# Altium PCB NMEA2K-Converter-v1.0.PcbDoc (part 4 of 4)
Units mil, origin at the board's own origin, x right, y up, seen from the top; angles counter-clockwise.
Board outline 1771.65 x 1968.5 mil, 4 copper layers (Top Layer, Layer 1, Layer 2, Bottom Layer), stack 62.45 mil thick; 138 components, 82 nets, 467 pads, 178 vias.
Unrouted connection lines stored in the file: 6.
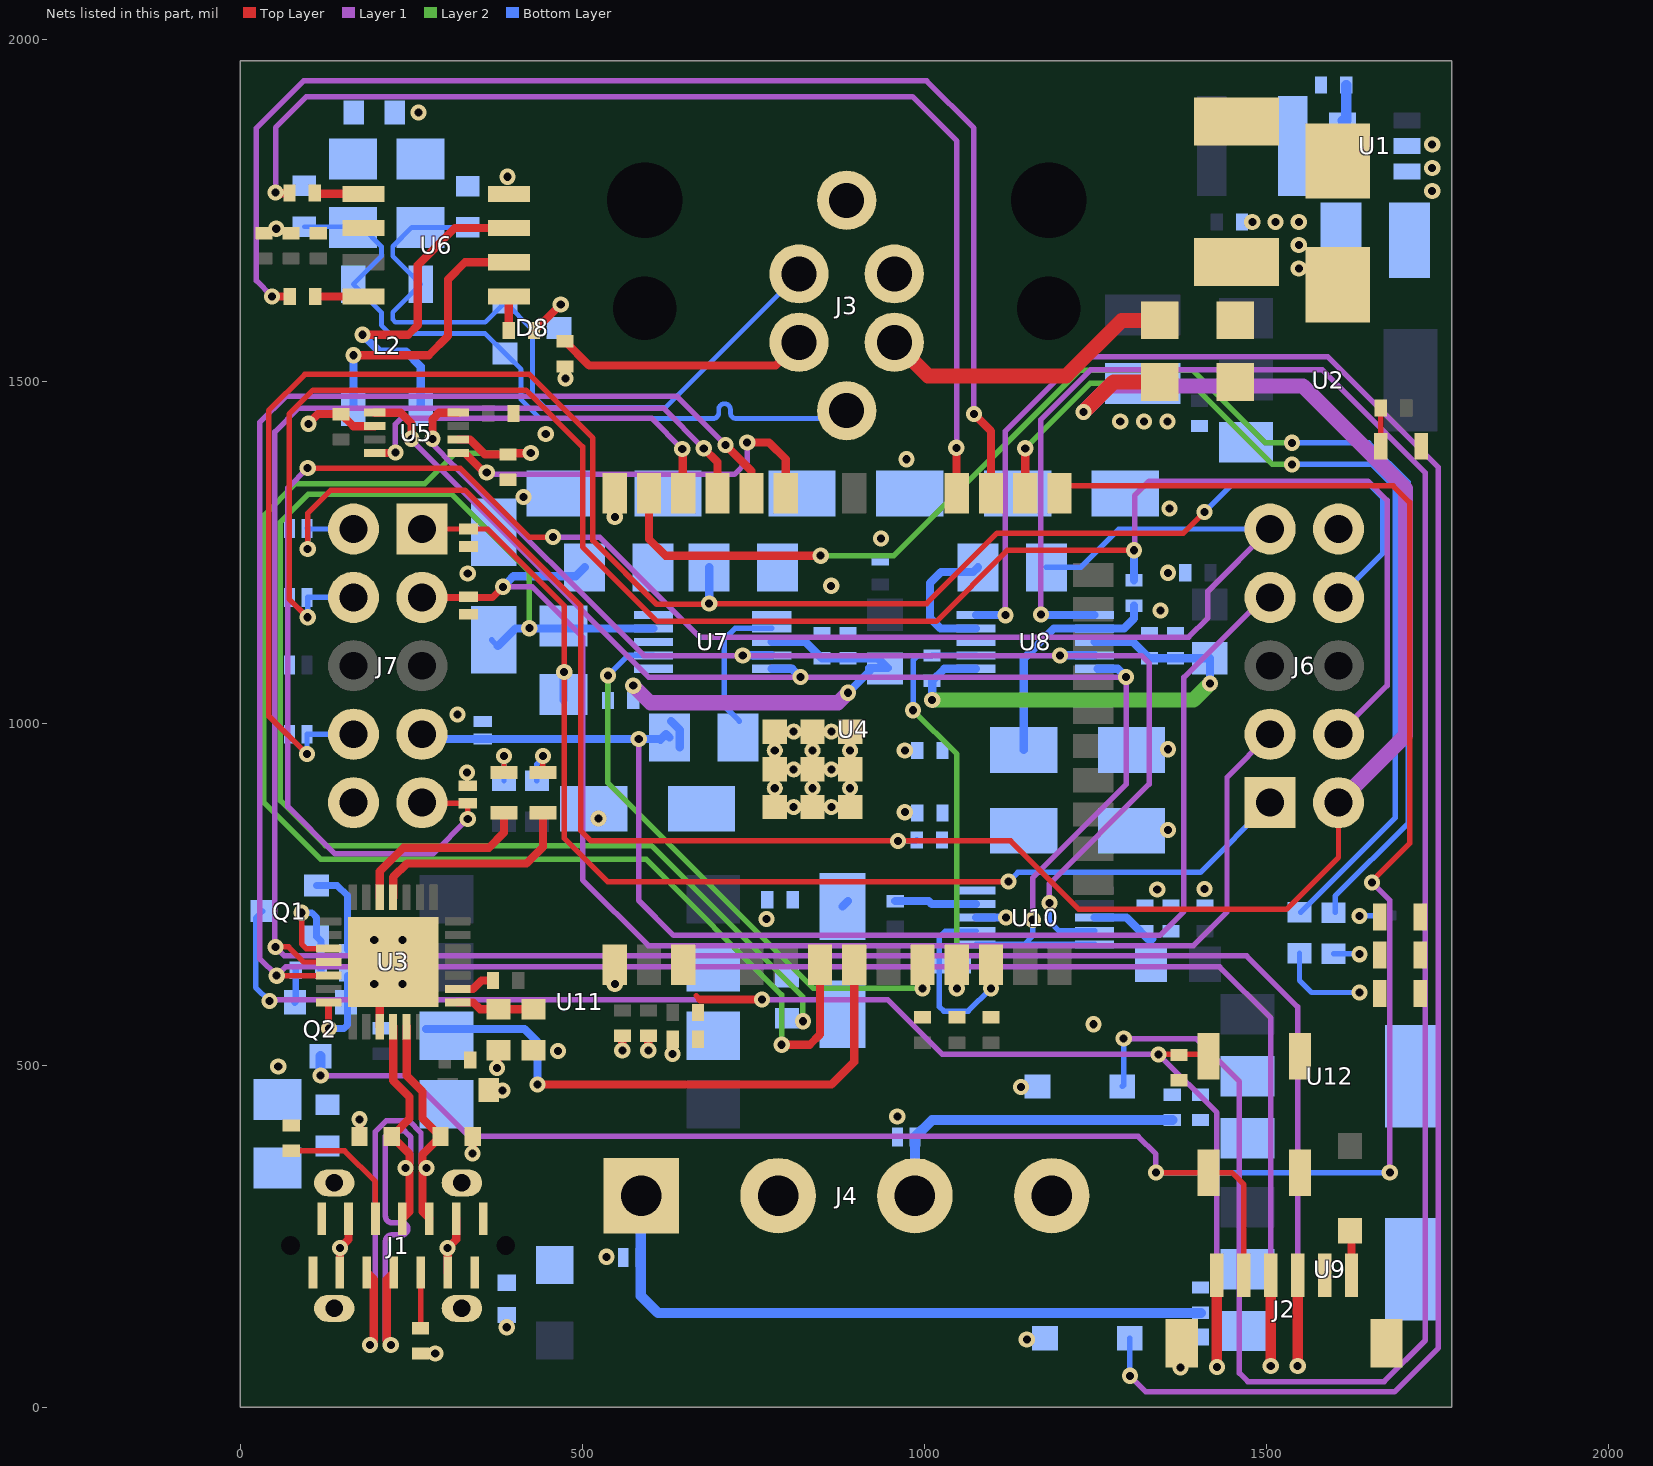
[diagram p4: the nets of this part, all layers, seen from the top]

## Via types
v1: diameter 23.62, hole 11.81, Top Layer to Bottom Layer, tented both sides, 178 vias

## Nets (pads, with @x,y where several pads share a name; then routed paths per layer and width w, separated by ;. In a path a pad name is that pad's centre, name@x,y a point inside that pad or via, vN(x,y) a via of type N, cw(c..) or ccw(c..) an arc to the next point about the centre after c; other vN are vias at no path point) (continued)
CAN_N: C21.1 D8.1 J3.5 L2.3 R23.1 | length 1070
  Bottom Layer w7: C21.1@93.87,1725.68 163.87,1725.68 R23.1@164.87,1724.68 178.62,1724.68 206.62,1696.68 206.62,1682.4 L2.3@165.66,1641.44 206.62,1600.48 206.62,1581.59 218.79,1569.43 358.35,1569.43 D8.1@387.5,1540.28 410.87,1516.91 410.87,1472.84 438.54,1445.18 687.87,1445.18 691.37,1445.18 ccw(c691.37,1453.68) 699.87,1453.68 699.87,1458.44 cw(c708.37,1458.44) 716.87,1458.44 716.87,1453.68 ccw(c725.37,1453.68) 725.37,1445.18 832.87,1445.18 875.37,1445.18 J3.5@886.87,1456.68
CAN_P: C19.2 D8.2 J3.4 L2.4 R19.2 | length 1070
  Bottom Layer w7: C19.2@332.87,1724.68 R19.2@263.87,1724.68 251.12,1724.68 223.12,1696.68 223.12,1682.4 L2.4@264.09,1641.44 223.12,1600.48 223.12,1590.03 227.22,1585.93 358.35,1585.93 D8.2@387.5,1615.08 427.37,1575.21 427.37,1479.68 445.37,1461.68 622.19,1461.68 J3.4@817.19,1656.68
CAN_VIN: D3.1 J3.2 | length 441.9
  Top Layer w22: J3.2@956.56,1556.68 1005.56,1507.68 1207.87,1507.68 1288.87,1588.68 D3.1@1344.64,1588.68
COOLANT: D22.1 R37.1 U7.7 | length 205.1
  Bottom Layer w8: R37.1@729.87,1002.68 707.87,1024.68 707.87,1122.68 723.59,1138.39 U7.7@777.35,1138.39
DI0: R30.2 U4.8 U11.6 | length 851.5
  Top Layer w12: v1(434.87,471.68) 864.87,471.68 897.87,504.68 U4.8@897.87,646.7
  Bottom Layer w12: U11.6@271.97,552.68 415.87,552.68 434.87,533.68 434.87,507.59 v1(434.87,471.68)
DTR: Q2.2 R7.1 U3.28 | length 139.7
  Top Layer w10: U3.28@129.39,591.62 129.39,554.17 v1(129.87,553.68)
  Bottom Layer w10: v1(129.87,553.68) 151.87,553.68 156.87,558.68 R7.1@156.87,631.18
EN: C14.2 C15.2 J2.6 Q1.3 R12.1 SW2.1 U4.3 | length 2276.9
  Top Layer w8: 666.87,601.68 672.83,595.72 ; v1(1342.87,515.68) 1412.94,515.68 SW2.1@1415.94,512.68
  Top Layer w12: 672.83,595.72 v1(762.84,595.72)
  Top Layer w15: v1@1428.02,58.79 J2.6@1428.02,192.68
  Layer 1 w8: v1(42.87,593.68) 44.92,595.72 v1(762.84,595.72) 946.83,595.72 1026.87,515.68 v1(1342.87,515.68) 1428.13,430.42 v1(1428.13,58.68)
  Bottom Layer w8: Q1.3@33.13,725.08 22.87,714.82 22.87,613.68 v1(42.87,593.68)
FUEL1: D27.2 R28.1 U8.5 | length 2886.5
  Layer 1 w8: v1(1118.87,1157.68) 1118.87,1426.68 1227.87,1535.68 1589.87,1535.68 1751.87,1373.68 1751.87,86.68 1687.47,22.27 1324.28,22.27 v1(1300.87,45.68)
  Bottom Layer w8: v1(1300.87,45.68) D27.2@1300.87,100.68
  Bottom Layer w12: U8.5@1076.12,1158.08 1118.47,1158.08 v1(1118.87,1157.68)
FUEL2: D28.2 R33.1 U8.6 | length 3280.6
  Layer 1 w8: v1(1170.87,1158.68) 1170.87,1443.68 1243.87,1516.68 1338.87,1516.68 1582,1516.68 1732.87,1365.81 1732.87,97.68 1672.47,37.27 1473.28,37.27 1460.87,49.68 1460.87,475.68 1397.87,538.68 v1(1291.87,538.68)
  Bottom Layer w8: D28.2@1289.87,468.68 1291.87,470.68 v1(1291.87,538.68)
  Bottom Layer w12: v1(1170.87,1158.68) 1171.42,1158.13 U8.6@1249.3,1158.13
FUEL_IN1: D17.2 J4.1 R27.1 R28.2 U9.1 | length 975.2
  Bottom Layer w15: J4.1@585.87,309.06 D17.2@585.87,218.68 585.87,162.68 610.87,137.68 R27.1@1404.37,137.68
FUEL_IN2: D18.2 J4.3 R32.1 R33.2 U12.1 | length 472.1
  Bottom Layer w15: J4.3@986.61,309.06 986.61,394.42 1011.87,419.68 R33.2@1362.87,419.68
GND: C2.1 C3.1 C4.1 C5.1 C6.1 C7.2 C8.1 C9.1 C10.1 C11.1 C12.1 C13.1 C14.1 C15.1 C16.1 C17.2 C18.1 C19.1 C20.2 C21.2 C22.2 C23.2 C24.2 C25.2 C26.2 C27.2 C28.2 C29.2 C30.2 D2.1 D5.1 D6.1 D7.1 D8.3 D9.1 D10.1 D11.1 D12.1 D13.1 D14.1 D15.1 D16.1 D17.1 D18.1 D19.2 D20.2 D21.2 D22.2 D23.2 D24.2 D25.2 D26.2 D27.1 D28.1 J1.A1 J1.A12 J1.B1 J1.B12 J2.2 J2.MP1 J2.MP2 J3.3 J3.SH J4.2 J4.4 J6.10 J7.10 LED1.2 LED4.2 LED5.2 LED6.2 R2.2 R3.2 R8.1 R10.1 R13.1 R21.1 R41.1 R42.1 R43.1 SB1.1 SW1.2 SW2.2 U1.4 U2.1 U3.3 U3.29 U4.1 U4.38 U4.39 U5.2 U6.2 U6.8 U7.1 U7.3 U8.3 U10.3 U11.3 U11.5 | length 496.5
  Top Layer w12: v1(99.94,1437.5) 114.12,1451.68 C11.1@147.87,1451.68 165.5,1434.05 U5.2@196.83,1434.05 ; D6.1@174.63,395.68 174.87,395.92 v1(174.87,420.68) v1@174.87,422.68 ; U3.3@204.19,556.19 204.19,630.99 U3.29@223.87,650.68 ; R3.2@263.87,78.18 v1(285.37,78.18) ; v1@340.12,370.68 D7.1@340.12,395.68 ; C8.1@363.87,461.68 382.87,461.68 v1(383.87,462.68) ; v1(375.87,495.68) 375.87,519.68 R8.1@377.87,521.68 ; R21.1@429.87,1573.68 430.87,1573.68 v1(468.87,1611.68) ; v1(558.87,521.18) C13.1@558.87,542.68 ; v1(596.87,521.18) C12.1@596.87,542.68 ; v1(632.37,516.18) C14.1@632.37,537.68
  Bottom Layer w12: U10.3@1076.12,715.68 v1(1119.87,715.68)
  other v1: 1374.87,57.68 1150.23,98.65 389.87,116.68 535.87,219.68 339.87,370.68 960.87,424.68 1141.87,467.68 55.87,497.68 1247.87,559.68 196.23,618.65 237.23,618.65 547.87,618.53 196.23,682.65 237.23,682.65 769.87,713.68 1340.87,756.68 1409.98,757.28 1356.87,843.68 524.23,860.65 971.87,869.68 331.87,927.68 971.87,959.68 1356.87,961.68 317.87,1012.68 1345.87,1164.68 864.23,1200.65 332.87,1218.68 1356.87,1219.68 936.87,1269.68 547.87,1301.19 1358.87,1313.68 414.23,1330.65 974.23,1385.65 446.96,1422.5 1286.87,1440.68 1321.37,1440.68 1355.87,1440.68 475.87,1503.68 1547.87,1664.68 1547.87,1698.68 52.87,1722.68 1479.87,1732.68 1513.87,1732.68 1547.87,1732.68 390.87,1798.68 260.87,1892.68
I2C_OE: R13.2 U4.7 U5.6 | length 2073.7
  Top Layer w12: U5.6@318.87,1414.36 336.19,1414.36 357.87,1392.68 R13.2@391.87,1392.68 R13.2@395.56,1392.68 ; R13.2@396.93,1392 396.93,1393.13 398.37,1394.58 v1(424.97,1394.58) ; v1(791.87,529.68) 832.87,529.68 847.87,544.68 U4.7@847.87,646.7
  Layer 2 w8: v1(424.97,1394.58) 314.78,1394.58 270.06,1349.87 81.06,1349.87 34.87,1303.68 34.87,883.81 118,800.68 593.87,800.68 791.87,602.68 v1(791.87,529.68)
IG_ON_PWR: D1.1 D16.2 J6.2 J7.2 R44.2 | length 3435.2
  Top Layer w8: v1(98.87,1254.68) 98.87,1306.68 132.87,1340.68 328.87,1340.68 497.87,1171.68 497.87,842.68 512.87,827.68 v1(961.87,827.68) 1126.42,827.68 1226.42,727.68 1529.87,727.68 1605.87,803.68 J6.2@1605.87,883.68
  Top Layer w22: v1(1233,1454.55) 1277.02,1498.56 1344.76,1498.56 D1.1@1344.64,1498.68
  Layer 1 w22: v1(1233,1454.55) 1271.13,1492.68 1554,1492.68 1703.87,1342.81 1703.87,981.68 J6.2@1605.87,883.68
  Bottom Layer w8: D16.2@97.87,1284.68 D16.2@98.87,1283.68 ; v1(98.87,1254.68) D16.2@98.87,1283.68 ; J7.2@165.87,1283.68 D16.2@98.87,1283.68 ; v1(961.87,827.68) 987.65,827.68 R44.2@989.17,829.2
IO0: J2.5 Q2.3 SW1.1 U4.25 | length 3478.5
  Top Layer w8: U4.25@1197.87,1335.68 1197.87,1342.68 1201.87,1346.68 1685.87,1346.68 1709.87,1322.68 1709.87,824.21 1654.87,769.21 v1(1654.87,766.68) ; v1(1338.87,342.68) SW1.1@1415.94,342.68 1449.87,342.68 1467.39,325.16 J2.5@1467.39,192.68
  Layer 1 w8: v1(117.87,484.68) 245.87,484.68 334.87,395.68 1312.87,395.68 1338.87,369.68 v1(1338.87,342.68) ; v1(1654.87,766.68) 1680.87,740.68 v1(1680.87,342.68)
  Bottom Layer w8: v1(1338.87,342.68) v1(1680.87,342.68)
  Bottom Layer w15: Q2.3@117.47,512.94 117.47,485.08 v1(117.87,484.68)
IO4: R15.1 U4.26 | length 1387
  Top Layer w12: U4.26@1147.87,1335.68 v1(1147.87,1401.68)
  Layer 2 w8: v1(1147.87,1401.68) 1242.87,1496.68 1390.66,1496.68 1509.26,1378.08 v1(1537.87,1378.08)
  Bottom Layer w8: v1(1537.87,1378.08) 1654.73,1378.08 1688.87,1343.94 1688.87,861.68 R15.1@1550.87,723.68
IO23: R14.1 U4.37 | length 2039.5
  Top Layer w12: U4.37@597.87,1335.68 597.87,1268.68 621.87,1244.68 v1(848.87,1244.68)
  Layer 2 w8: v1(848.87,1244.68) 955.87,1244.68 1226.87,1515.68 1392.87,1515.68 1498.87,1409.68 v1(1537.87,1409.68)
  Bottom Layer w8: v1(1537.87,1409.68) 1650,1409.68 1707.87,1351.81 1707.87,853.81 1600.87,746.81 R14.1@1600.87,723.68
IO25: R16.2 R25.1 U4.10 U7.2 | length 856.9
  Layer 2 w8: v1(537.87,1069.68) 537.87,912.68 605.87,844.68 838.34,612.22 v1(997.87,612.22)
  Bottom Layer w8: R25.1@537.87,1032.68 v1(537.87,1069.68) 567.22,1099.02 U7.2@604.12,1099.02
IO26: R17.2 R26.1 U4.11 U8.2 | length 605.3
  Layer 2 w8: v1(983.87,1018.69) 1047.87,954.69 1047.87,769.68 v1(1047.87,612.22)
  Bottom Layer w8: v1@983.87,1014.68 v1(983.87,1018.69) 983.87,1091.68 990.87,1098.68 R26.1@1011.87,1098.68 1012.22,1099.02 U8.2@1076.12,1099.02
IO27: R18.2 R31.1 U4.12 U10.2 | length 251.5
  Bottom Layer w8: U10.2@1076.12,695.99 1031.19,695.99 1022.37,687.18 R31.1@1022.37,646.68 1022.37,585.18 1028.87,578.68 1064.34,578.68 v1(1097.87,612.22)
NetC1_1: C1.1 L1.1 U1.5
NetC1_2: C1.2 U1.6 | length 57.3
  Bottom Layer w15: U1.6@1611.63,1881.08 1617.37,1881.08 C1.2@1617.37,1932.68
NetC9_2: C9.2 J1.S1 J1.S2 J1.S3 J1.S4 R10.2
NetC20_1: C20.1 R19.1 R23.2
NetC22_1: C22.1 C23.1 FB1.1 R25.2 U7.8 | length 591.9
  Layer 1 w22: v1(574.87,1054.62) 599.82,1029.68 874.25,1029.68 v1(888.87,1044.3)
  Bottom Layer w12: U7.8@777.35,1118.71 826.84,1118.71 C22.1@850.87,1094.68 C23.1@888.87,1094.68 932.87,1094.68 946.87,1080.68 919.87,1080.68 919.87,1075.3 v1(888.87,1044.3)
NetC25_1: C25.1 C26.1 FB2.1 R26.2 U8.1 U8.8 | length 729
  Layer 2 w22: v1(1011.87,1033.68) 1393.87,1033.68 v1(1417.87,1057.68)
  Bottom Layer w12: v1(1011.87,1033.68) R26.2@1011.87,1061.68 1029.54,1079.34 U8.1@1076.12,1079.34 ; U8.8@1249.35,1118.71 1305.72,1118.71 C25.1@1329.75,1094.68 C26.1@1367.87,1094.68 FB2.1@1417.87,1094.68 v1@1417.87,1059.68
NetC28_1: C28.1 C29.1 FB3.1 R31.2 U10.8 | length 97.4
  Bottom Layer w12: U10.8@1249.35,715.68 1295.87,715.68 1306.87,704.68 1326.87,684.68 1333.87,684.68
NetD1_2: D1.2 D3.2 F1.2
NetD29_1: D29.1 J2.1 | length 65.8
  Top Layer w12: D29.1@1622.87,257.68 1624.87,255.68 J2.1@1624.87,192.68
NetJ1_A5: J1.A5 R2.1 | length 195.9
  Top Layer w8: R2.1@74.87,374.68 152.87,374.68 197.99,329.56 J1.A5@197.99,275.42
NetJ1_B5: J1.B5 R3.1 | length 81.8
  Top Layer w7: R3.1@263.87,115.18 R3.1@264.13,115.18
  Top Layer w8: R3.1@264.13,115.18 J1.B5@264.13,196.68
NetJ3_1: J3.1 SB1.2 | length 371.1
  Top Layer w12: SB1.2@474.87,1558.18 510.37,1522.68 783.19,1522.68 J3.1@817.19,1556.68
NetL2_1: L2.1 U6.7 | length 494.4
  Top Layer w12: v1(178.87,1567.68) 245.87,1567.68 259.87,1581.68 259.87,1669.68 313.87,1723.68 U6.7@393.17,1723.68
  Bottom Layer w12: v1(178.87,1567.68) 203.56,1542.99 242.56,1542.99 264.09,1521.46 264.09,1487.51 L2.1@264.09,1461.91
NetL2_2: L2.2 U6.6 | length 408
  Top Layer w12: v1(165.87,1537.68) 275.87,1537.68 303.87,1565.68 303.87,1648.68 328.87,1673.68 U6.6@393.17,1673.68
  Bottom Layer w12: L2.2@165.66,1461.91 v1@165.66,1537.68
NetLED1_1: LED1.1 R1.2 | length 56.1
  Top Layer w8: LED1.1@1667.82,1404.68 R1.2@1667.82,1460.73
NetLED2_1: LED2.1 R6.1 | length 60.3
  Top Layer w8: LED2.1@385.87,927.73 v1(385.87,951.87)
  Bottom Layer w8: R6.1@385.87,915.68 v1(385.87,951.87)
NetLED2_2: LED2.2 U3.19 | length 271.9
  Top Layer w12: U3.19@204.19,745.17 204.19,782.83 239.04,817.68 363.87,817.68 385.87,839.68 LED2.2@385.87,868.68
NetLED3_1: LED3.1 R9.1 | length 64.1
  Top Layer w8: LED3.1@442.87,927.73 v1(442.87,951.87)
  Bottom Layer w8: R9.1@433.87,915.68 433.87,939.96 442.87,948.96 v1(442.87,951.87)
NetLED3_2: LED3.2 U3.18 | length 316.7
  Top Layer w12: U3.18@223.87,745.17 223.87,774.68 243.87,794.68 418.87,794.68 442.87,818.68 LED3.2@442.87,868.68
NetLED4_1: LED4.1 R14.2 | length 38.2
  Bottom Layer w8: R14.2@1598.87,662.68 1636.21,662.68 v1(1636.8,662.08)
NetLED5_1: LED5.1 R15.2 | length 135.2
  Bottom Layer w8: R15.2@1548.87,663.68 1548.87,623.68 1566.47,606.08 v1(1636.8,606.08)
NetLED6_1: LED6.1 R20.1 | length 27.3
  Bottom Layer w8: v1(1636.8,718.08) 1663.28,718.08 R20.1@1663.87,718.68
NetQ1_1: Q1.1 R7.2 | length 130.6
  Bottom Layer w10: Q1.1@111.87,762.48 142.07,762.48 156.87,747.68 R7.2@156.87,668.18
NetQ2_1: Q2.1 R11.2 | length 47.5
  Bottom Layer w10: Q2.1@80.07,591.68 81.37,592.98 R11.2@81.37,638.68
NetR4_2: R4.2 U3.9 | length 56.6
  Top Layer w12: U3.9@318.36,611.31 340.5,611.31 352.87,623.68 R4.2@369.87,623.68
NetR5_2: R5.2 R8.2 U3.8 | length 114.6
  Top Layer w12: U3.8@318.36,591.62 340.93,591.62 350.87,581.68 R8.2@377.87,581.68 R5.2@428.87,581.68
NetR21_2: R21.2 U6.5 | length 50.1
  Top Layer w12: R21.2@392.87,1573.68 392.87,1623.38 U6.5@393.17,1623.68
NetR22_2: R22.2 U6.4 | length 70.7
  Top Layer w12: R22.2@109.87,1623.68 U6.4@180.57,1623.68
NetR24_2: R24.2 U6.1 | length 70.7
  Top Layer w12: R24.2@109.87,1773.68 U6.1@180.57,1773.68
NetR27_2: R27.2 U9.2 U9.4
NetR29_1: R29.1 U11.2
NetR32_2: R32.2 U12.2 U12.4
OIL_PRESS: D21.1 R36.1 U7.6
OIL_PRESS_IN: D11.2 J6.8 J7.8 R36.2 | length 2806.1
  Top Layer w8: v1(97.87,954.68) 41.87,1010.68 41.87,1456.68 94.87,1509.68 422.87,1509.68 515.87,1416.68 515.87,1266.68 608.87,1173.68 v1@684.87,1173.68 ; v1(685.87,1174.68) 1003.87,1174.68 1106.87,1277.68 1379.13,1277.68 v1(1409.94,1308.49)
  Bottom Layer w8: v1(97.87,954.68) D11.2@97.87,983.68 J7.8@165.87,983.68 ; v1(1409.94,1308.49) 1452.13,1350.68 1648.87,1350.68 1670.87,1328.68 1670.87,1248.68 J6.8@1605.87,1183.68
  Bottom Layer w12: v1(685.87,1174.68) R36.2@685.87,1227.68
OIL_TEMP-TRIM: D10.2 J6.3 J7.3 R35.2 | length 2036.4
  Top Layer w10: J7.3@265.87,1183.68 368.87,1183.68 v1(384.37,1199.18)
  Layer 1 w8: v1(384.37,1199.18) 427.37,1199.18 500.87,1125.68 500.87,770.68 596.87,674.68 1393.87,674.68 1442.87,723.68 1442.87,920.68 J6.3@1505.87,983.68
  Bottom Layer w12: v1@391.37,1206.18 399.87,1214.68 490.87,1214.68 R35.2@503.87,1227.68
RTS: Q1.2 R11.1 U3.24 | length 192.5
  Top Layer w8: v1(89.87,722.68) 89.87,676.99 96.5,670.36 U3.24@129.39,670.36
  Bottom Layer w10: v1(89.87,722.68) 104.87,722.68 111.87,715.68 Q1.2@111.87,687.68 118.37,681.18 R11.1@118.37,638.68
RXD0: J2.4 U3.26 U4.34 | length 3838.6
  Top Layer w8: v1(53.56,630.67) 53.68,630.67 129.06,630.67 U3.26@129.39,630.99
  Top Layer w12: v1(709.87,1406.68) 747.87,1368.68 U4.34@747.87,1335.68
  Top Layer w15: J2.4@1506.76,192.68 1506.82,192.62 1506.82,60.14 v1(1506.87,60.08)
  Layer 1 w8: v1(709.87,1406.68) 638.87,1477.68 66.87,1477.68 29.06,1439.87 29.06,655.28 53.68,630.67 66.43,643.42 1432.13,643.42 1506.87,568.68 v1(1506.87,60.08)
RXD1: R22.1 U4.27 | length 1932
  Top Layer w12: v1(46.87,1623.68) R22.1@72.87,1623.68 ; v1(1072.87,1451.68) 1097.87,1426.68 U4.27@1097.87,1335.68
  Layer 1 w8: v1(46.87,1623.68) 23.87,1646.68 23.87,1869.68 92.87,1938.68 1003.87,1938.68 1072.87,1869.68 v1(1072.87,1451.68)
SCL: U5.1 U7.10 U8.10 U10.1 U10.10 | length 1993.4
  Top Layer w12: U5.1@196.83,1453.73 234.82,1453.73 250.57,1437.98 v1(250.57,1415.54)
  Layer 1 w8: v1(250.57,1415.54) 250.57,1413.9 597.37,1067.11 858.31,1067.11 1291.21,1067.11 v1(1295.44,1067.11) 1295.44,910.24 1158.87,773.68 v1(1158.87,712.49)
  Bottom Layer w8: U10.1@1076.12,676.31 1076.21,676.4 1146.6,676.4 ; v1(1158.87,712.49) 1158.87,688.68 1146.6,676.4 ; U10.10@1249.87,676.21 1249.68,676.4 1146.6,676.4
  Bottom Layer w12: U7.10@777.35,1079.34 807.21,1079.34 v1(819.44,1067.11) ; U8.10@1253.35,1079.34 1283.21,1079.34 v1(1295.44,1067.11)
SCL_LV: U4.36 U5.4 | length 579.7
  Top Layer w12: U5.4@196.83,1394.68 196.92,1394.77 226.71,1394.77 v1(227.43,1395.49) ; v1(646.43,1400.86) 647.15,1400.14 647.15,1336.4 U4.36@647.87,1335.68
  Layer 1 w8: v1(227.43,1395.49) 226.84,1396.08 226.84,1436.64 235.51,1445.31 601.98,1445.31 v1(646.43,1400.86)
SDA: U5.8 U7.9 U8.9 U10.9 | length 1861.4
  Top Layer w12: v1(281.19,1415.54) 281.19,1444 290.93,1453.73 U5.8@318.87,1453.73
  Layer 1 w8: v1(281.19,1415.54) 281.19,1407.7 313.75,1375.15 590.22,1098.68 v1(734.87,1098.68) v1(1198.75,1098.68) 1317.87,1098.68 1328.87,1087.68 1328.87,910.68 1183.16,764.96 v1(1183.16,736.68)
  Bottom Layer w8: v1(1183.16,736.68) 1183.16,710.39 1197.46,696.09 1249.25,696.09 U10.9@1249.35,695.99
  Bottom Layer w12: v1(734.87,1098.68) 735.22,1099.02 U7.9@777.35,1099.02 ; v1@1198.8,1099.56 1198.8,1099.45 1199.17,1099.07 U8.9@1249.3,1099.07
SDA_LV: U4.33 U5.5 | length 587.7
  Top Layer w12: U5.5@318.87,1394.68 328.53,1394.68 354.79,1368.41 358.4,1368.41 v1(360.62,1366.19) ; v1(741.42,1410.22) 773.33,1410.22 797.87,1385.68 U4.33@797.87,1335.68
  Layer 1 w8: v1(360.62,1366.19) 363.13,1363.68 722.87,1363.68 741.42,1382.22 v1(741.42,1410.22)
STARTER: D24.1 R39.1 R41.2 U8.7 | length 338
  Bottom Layer w12: D24.1@1145.87,960.68 1145.87,1094.68 1189.59,1138.39 U8.7@1249.35,1138.39 1292.59,1138.39 1306.87,1152.68 R39.1@1306.87,1171.68
STARTER_IN: D14.2 J6.4 J7.4 R39.2 | length 2808.4
  Top Layer w8: v1(98.87,1154.68) 71.87,1181.68 71.87,1451.68 106.87,1486.68 417.87,1486.68 500.87,1403.68 500.87,1257.68 609.87,1148.68 1017.87,1148.68 1121.87,1252.68 v1(1306.87,1252.68) v1@1307.87,1252.68
  Layer 1 w8: v1@1307.87,1252.68 1307.87,1332.68 1328.87,1353.68 1648.87,1353.68 1676.87,1325.68 1676.87,1054.68 J6.4@1605.87,983.68
  Bottom Layer w8: v1(98.87,1154.68) 98.87,1183.68 J7.4@165.87,1183.68
  Bottom Layer w12: R39.2@1306.87,1208.68 1306.87,1251.68 v1@1307.87,1252.68
SWITCH: D26.1 R43.2 R44.1 U10.5
TACH: D19.1 R29.2 R34.1 U7.4 | length 2080.3
  Layer 2 w8: v1(422.87,1138.68) 422.87,1220.81 309,1334.68 99.87,1334.68 58.87,1293.68 58.87,886.68 124.87,820.68 601.87,820.68 822.83,599.72 v1(822.83,564.06)
  Bottom Layer w8: D19.1@367.87,1121.68 D19.1@375.87,1113.68
  Bottom Layer w12: D19.1@376.87,1112.68 402.59,1138.39 R34.1@472.87,1138.39 ; R34.1@477.59,1138.39 U7.4@604.12,1138.39
TACH_IN: D9.2 J6.1 J7.1 R34.2 | length 1746.2
  Top Layer w8: J7.1@265.87,1283.68 D9.2@333.87,1283.68 361.87,1283.68 473.87,1171.68 v1(473.87,1074.68) 473.87,831.68 537.43,768.13 v1(1123.68,768.13) v1@1120.7,765.14
  Bottom Layer w8: v1(1123.68,768.13) 1137.24,781.68 1403.87,781.68 J6.1@1505.87,883.68
  Bottom Layer w12: R34.2@472.87,1033.68 472.87,1073.68 v1(473.87,1074.68)
TILT_TRIM: D20.1 R35.1 U7.5
TXD0: J2.3 U3.25 U4.35 | length 3767.8
  Top Layer w8: v1(51.87,672.68) 70.87,672.68 92.87,650.68 U3.25@129.39,650.68
  Top Layer w12: v1(677.87,1401.68) 697.87,1381.68 U4.35@697.87,1335.68
  Top Layer w15: J2.3@1546.13,192.68 1546.19,192.62 1546.19,60.14 v1(1546.24,60.08)
  Layer 1 w8: v1@50.87,672.68 50.87,1425.68 85.51,1460.31 619.24,1460.31 v1(677.87,1401.68) ; v1(51.87,672.68) 64.87,659.68 1471.55,659.68 1546.24,584.98 v1(1546.24,60.08)
TXD1: R24.1 U4.28 | length 1673.1
  Top Layer w12: v1(51.87,1775.68) 52.87,1774.68 R24.1@72.37,1774.68 ; v1(1047.14,1402.41) 1047.51,1402.05 1047.51,1336.05 U4.28@1047.87,1335.68
  Layer 1 w8: v1(51.87,1775.68) 51.87,1870.68 96.87,1915.68 982.87,1915.68 1047.87,1850.68 1047.87,1403.15 v1(1047.14,1402.41)
USB_D_N: D7.2 J1.A7 J1.B7 U3.5 | length 881.9
  Top Layer w12: J1.B7@185.39,196.68 195.58,186.49 195.58,96.49 v1(189.77,90.68) ; U3.5@243.56,556.19 243.56,484.68 266.87,461.36 266.87,421.68 D7.2@292.87,395.68 266.55,369.35 v1@266.55,349.68 ; v1(272.36,349.68) 266.55,343.87 266.55,285.6 J1.A7@276.73,275.42
  Layer 1 w8: v1(189.77,90.68) 197.58,98.49 197.58,402.38 213.87,418.68 246.87,418.68 264.55,401 264.55,357.49 v1(272.36,349.68)
USB_D_P: D6.2 J1.A6 J1.B6 U3.4 | length 881.9
  Top Layer w12: v1(220.39,90.68) 214.58,96.49 214.58,186.49 J1.B6@224.76,196.68 ; U3.4@223.87,556.19 223.87,477.49 247.87,453.49 247.87,421.68 D6.2@221.87,395.68 247.55,370 v1@247.55,349.68 ; J1.A6@237.36,275.42 247.55,285.6 247.55,343.87 v1(241.74,349.68)
  Layer 1 w8: v1(220.39,90.68) 212.58,98.49 212.58,220.68 212.58,242.68 cw(c221.58,242.68) 221.58,251.68 236.15,251.68 ccw(c236.15,260.68) 236.15,269.68 221.58,269.68 cw(c221.58,278.68) 212.58,278.68 212.58,315.24 212.58,396.17 220.09,403.68 240.66,403.68 249.55,394.79 249.55,357.49 v1(241.74,349.68)
VBUS: D4.1 D5.2 J1.A4 J1.A9 J1.B4 J1.B9 R5.1 | length 167.9
  Top Layer w12: J1.B9@146.02,196.68 v1(146.02,232.53) 158.62,245.13 J1.A4@158.62,275.42 ; J1.B4@303.5,196.68 v1(303.5,232.53) 316.1,245.13 J1.A9@316.1,275.42
  other v1: 464.87,520.68
VIN: C2.2 D2.2 F1.1 U1.2 U1.3
  other v1: 1742.87,1777.68 1742.87,1811.68 1742.87,1845.68
VOLT_SIG: D25.1 R40.1 R42.2 U10.4 | length 131.3
  Bottom Layer w12: D25.1@880.87,731.68 D25.1@888.87,739.68 ; R40.1@957.87,739.68 964.2,739.68 1006.87,739.68 1011.19,735.36 U10.4@1076.12,735.36
WARNING: D23.1 R38.1 U8.4 | length 204.1
  Bottom Layer w12: U8.4@1076.12,1138.39 1024.16,1138.39 1008.87,1153.68 1008.87,1204.68 1024.87,1220.68 1071.87,1220.68 R38.1@1078.87,1227.68
WARNING_IN: D13.2 J6.9 J7.9 R38.2 | length 2857.5
  Top Layer w8: v1(98.87,1372.68) 321.87,1372.68 422.71,1271.84 v1(457.45,1271.84) ; J7.9@265.87,882.68 D13.2@332.87,882.68 v1(332.87,859.68)
  Layer 1 w8: v1(98.87,1372.68) 69.87,1343.68 69.87,877.68 138.87,808.68 281.87,808.68 v1(332.87,859.68) ; v1(457.45,1271.84) 525.71,1271.84 671.87,1125.68 1386.87,1125.68 1414.87,1153.68 1414.87,1192.68 J6.9@1505.87,1283.68
  Bottom Layer w8: R38.2@1178.87,1227.68 1228.87,1227.68 1284.87,1283.68 J6.9@1505.87,1283.68
WATER_TEMP: D12.2 J6.7 J7.7 R37.2 | length 1999.2
  Layer 1 w8: v1(582.87,976.68) 582.87,740.68 633.87,689.68 1344.87,689.68 1379.87,724.68 1379.87,1066.68 1496.87,1183.68 J6.7@1505.87,1183.68
  Bottom Layer w12: J7.7@265.87,983.68 272.87,976.68 613.87,976.68 614.87,975.68 622.87,983.68 R37.2@627.87,978.68 ; R37.2@629.87,1002.68 642.87,989.68 R37.2@642.87,964.68
pads on no net: J1. J3.MH U3.1 U3.2 U3.10 U3.11 U3.12 U3.13 U3.14 U3.15 U3.16 U3.17 U3.20 U3.21 U3.22 U3.23 U3.27 U4.4 U4.5 U4.6 U4.9 U4.13 U4.14 U4.15 U4.16 U4.17 U4.18 U4.19 U4.20 U4.21 U4.22 U4.23 U4.24 U4.29 U4.30 U4.32 U10.6 U10.7 U11.1 U11.4

## Polygon pours and split planes (outlines as drawn)
GND on Top Layer "GND_L01_P000" (solid, remove dead copper, pour order 0): 0,0 0,1968.5 1771.65,1968.5 1771.65,0
3V3 on Top Layer "3V3_L01_P011" (solid, remove dead copper, pour order 11): 286.87,433.68 302.87,417.68 369.87,417.68 369.87,435.68 325.87,435.68 318.87,442.68 318.87,577.68 257.87,577.68 257.87,523.68 286.87,494.68
VIN on Top Layer "VIN_L01_P008" (solid, pour order 8): 1341.87,1967.68 1772.87,1967.68 1772.87,1752.68 1341.87,1752.68
3V3 on Bottom Layer "3V3_L04_P009" (solid, remove dead copper, pour order 9): 1772.87,1422.68 1682.87,1422.68 1642.87,1462.68 1382.87,1462.68 1382.87,1536.68 1537.87,1536.68 1537.87,1634.68 1772.87,1634.68
GND on Bottom Layer "GND_L04_P001" (solid, remove dead copper, pour order 1): 0,0 0,1968.5 1771.65,1968.5 1771.65,0
VBUS on Bottom Layer "VBUS_L04_P010" (solid, remove dead copper, pour order 10): 497.87,267.68 497.87,540.68 438.87,540.68 438.87,267.68 58.87,267.68 58.87,169.68 497.87,169.68
NetC9_2 on Bottom Layer "NETC9_2_L04_P013" (solid, remove dead copper, pour order 13): 152.87,350.68 152.87,398.68 -4.13,398.68 -4.13,118.68 356.87,118.68 356.87,169.68 52.87,169.68 52.87,269.68 357.87,269.68 357.87,350.68 355.87,350.68
5V on Bottom Layer "5V_L04_P007" (solid, remove dead copper, pour order 7): 1441.87,1971.68 1441.87,1663.68 1525.87,1663.68 1525.87,1556.68 1258.87,1556.68 1258.87,1971.68
NetC1_1 on Bottom Layer "NETC1_1_L04_P006" (solid, remove dead copper, pour order 6): 1596.87,1971.68 1596.87,1914.68 1580.87,1914.68 1580.87,1857.68 1631.87,1857.68 1631.87,1829.68 1580.87,1829.68 1580.87,1770.68 1497.87,1770.68 1497.87,1971.68
VIN on Bottom Layer "VIN_L04_P005" (solid, remove dead copper, pour order 5): 1772.87,1857.68 1667.87,1857.68 1667.87,1644.68 1772.87,1644.68
3V3 on Layer 2 "3V3_L03_P002" (solid, remove dead copper, pour order 2): 1254.87,381.68 1254.87,603.68 1466.87,603.68 1466.87,381.68 1771.65,381.68 1771.65,1731.68 1396.87,1731.68 1396.87,1141.6 1666.87,1141.6 1666.87,1020.68 1466.87,1020.68 1466.87,674.68 157.87,674.68 157.87,381.68
5V on Layer 2 "5V_L03_P014" (solid, remove dead copper, pour order 14): 0,0 0,1968.5 1771.65,1968.5 1771.65,0
12V_BATT on Layer 2 "12V_BATT_L03_P012" (solid, remove dead copper, pour order 12): 109.87,1134.68 109.87,820.68 701.87,820.68 701.87,687.68 1453.87,687.68 1453.87,1028.68 1658.87,1028.68 1658.87,1134.68
GND on Layer 1 "GND_L02_P003" (solid, remove dead copper, pour order 3): 0,0 0,1968.5 1771.65,1968.5 1771.65,0

## Other copper
Top Layer:
  rectangle net 3V3: 957.87,517.68 1112.87,545.68
  rectangle net NetLED5_1: 1628.87,597.68 1674.87,613.68
  rectangle net NetLED4_1: 1628.87,653.68 1674.87,669.68
  rectangle net NetLED6_1: 1628.87,709.68 1674.87,725.68
  rectangle net GND: 17.87,1708.68 211.87,1735.68
  rectangle net 3V3: 17.87,1661.68 211.87,1688.68
  rectangle net VBUS: 420.87,509.68 464.87,531.68
  region net ACT-LED: 909.67,1335.68 886.07,1335.68 886.07,1301.19 909.67,1301.19
  region net GND: 559.67,1335.68 536.07,1335.68 536.07,1301.19 559.67,1301.19
  region net GND: 559.67,646.7 536.07,646.7 536.07,612.22 559.67,612.22
  region net IO25: 1009.67,646.7 986.07,646.7 986.07,560.68 1009.67,560.68
  region net IO26: 1059.67,646.7 1036.07,646.7 1036.07,560.68 1059.67,560.68
  region net IO27: 1109.67,646.7 1086.07,646.7 1086.07,560.68 1109.67,560.68
  rectangle net NetD1_2: 1393.87,1463.68 1525.87,1709.68
  rectangle net EN: 652.87,524.68 679.87,609.68
  rectangle net EN: 627.87,601.68 666.87,677.68
  rectangle net 3V3: 541.87,561.68 641.87,589.68
  rectangle net 3V3: 577.87,563.68 615.87,676.68
Bottom Layer:
  rectangle net NetC28_1: 1306.87,621.68 1376.87,704.68
  rectangle net STARTER: 1016.87,946.68 1173.87,973.68
  rectangle net VOLT_SIG: 798.87,729.68 971.87,753.68
  rectangle net SWITCH: 1015.87,805.68 1198.87,889.68
  rectangle net 12V_BATT: 88.87,1069.68 286.87,1099.68
  rectangle net TACH: 781.87,550.68 835.87,583.68
  rectangle net NetR29_1: 691.87,614.68 816.87,642.68
  rectangle net TACH_IN: 436.87,1003.68 507.87,1085.68
  rectangle net TACH: 333.87,1072.68 405.87,1170.68
  rectangle net WATER_TEMP: 595.87,936.68 658.87,1016.68
  rectangle net NetC22_1: 566.87,1023.68 582.87,1060.68
  rectangle net NetC25_1: 1390.87,1042.68 1443.87,1125.68
  rectangle net NetC25_1: 1317.74,1042.68 1443.87,1106.69
  rectangle net NetC22_1: 838.86,1031.68 969.87,1106.69
  rectangle net NetC28_1: 1047.87,633.68 1372.87,659.68
  rectangle net SWITCH: 1045.87,748.68 1104.87,889.68
  rectangle net TACH: 333.87,1097.68 507.87,1170.68
  rectangle net WARNING: 1047.87,1192.68 1108.87,1369.68
  region net OIL_PRESS: 818.87,1368.68 747.87,1368.68 747.87,1151.68 818.87,1151.68
  region net OIL_PRESS: 810.59,1164.68 748.59,1164.68 748.59,1151.68 810.59,1151.68
  rectangle net TILT_TRIM: 570.87,1151.68 632.87,1164.68
  rectangle net TILT_TRIM: 570.87,1151.68 636.87,1370.68
  rectangle net 12V_BATT: 976.87,713.68 1000.87,724.68
  rectangle net 12V_BATT: 944.87,692.68 1000.87,713.68
  region net 5V: 892.87,1214.68 892.87,1189.68 948.61,1189.68 948.61,1214.68
  region net 5V: 948.87,1213.68 921.87,1213.68 921.87,1136.94 948.87,1136.94
  region net 5V: 1430.61,1158.68 1430.61,1186.42 1366.87,1186.42 1366.87,1158.68
  rectangle net 5V: 1405.87,1160.68 1430.87,1234.68
  rectangle net 5V: 432.87,68.68 564.87,127.68
  rectangle net COOLANT: 619.87,837.68 760.87,907.68
  rectangle net COOLANT: 694.87,868.68 760.87,1027.68
  rectangle net NetC20_1: 150.87,1811.68 279.87,1835.68
  rectangle net NetC20_1: 150.87,1811.68 180.87,1910.68
  rectangle net WARNING: 1077.87,1297.68 1186.87,1365.68
  rectangle net NetR29_1: 621.87,605.68 746.87,687.68
  rectangle net 5V: 262.87,605.68 349.87,790.68
  rectangle net DI0: 192.87,544.68 271.97,562.68
  rectangle net FUEL1: 1282.87,89.68 1379.87,115.68
  rectangle net FUEL2: 1269.87,447.68 1375.87,487.68
  rectangle net 5V: 1360.87,253.68 1512.87,324.68
  rectangle net 5V: 1385.87,544.68 1515.87,704.68
  rectangle net FUEL_IN1: 1390.87,81.68 1512.87,147.68
  rectangle net NetR27_2: 1387.87,166.68 1752.87,231.68
  rectangle net FUEL_IN2: 1348.87,363.68 1512.87,432.68
  rectangle net NetR32_2: 1387.87,447.68 1752.87,512.68

## Silkscreen, mask and mechanical layers (free items; w line width, h text height)
Top Overlay:
  lines w5: 9.37,1737.68 9.37,1861.18 10.87,1862.68 ; 9.37,1737.68 139.87,1737.68 139.87,1657.68 9.37,1657.68 9.37,1737.68 ; 10.87,1862.68 10.87,1956.68 135.87,1956.68 135.87,1862.68 10.87,1862.68
  text "3V3" at 1512.24,1379.75 h40
  text "TX" at 410.51,954.78 h40 r90
  text "RX" at 467.51,954.78 h40 r90
  text "NMEA" at 1491.87,691.78 h40
  text "POWER" at 1491.67,635.93 h40
  text "FAULT" at 1491.87,579.77 h40
  text "ENABLE" at 1404.87,412.46 h40
  text "BOOT" at 1405.28,242.68 h40
  text "VOLTLINK" at 1381.76,6.68 h40
Bottom Overlay:
  lines w5: 34.87,628.68 44.87,638.68 68.87,638.68 ; 529.87,1187.68 529.87,1175.68 530.87,1174.68 ; 1327.87,745.18 1327.87,772.68 1337.87,782.68 1372.87,782.68 ; 1329.75,1082.18 1329.75,1056.8 1332.87,1053.68 ; 1367.87,747.68 1367.87,762.68 1377.87,772.68 1412.87,772.68 1422.87,782.68
  text "V1.0" at 1765.73,5.05 h40
Mechanical 1:
  drawing of 1757 lines, arcs and shapes, not listed
Mechanical 2:
  drawing of 295 lines, arcs and shapes, not listed
  text "Layer" at 2363.45,3427.68 h60
  text "Name" at 2773.36,3427.68 h60
  text "Material" at 3703.11,3427.68 h60
  text "Thickness" at 4562.87,3427.68 h60
  text "Constant" at 5212.71,3427.68 h60
  text "Board Layer Stack" at 5782.57,3427.68 h60
  text "Top Overlay" at 2773.36,3307.68 h60
  text "Top Solder" at 2773.36,3187.68 h60
  text "Solder Resist" at 3703.11,3187.68 h60
  text "0.40mil" at 4562.87,3187.68 h60
  text "3.5" at 5212.71,3187.68 h60
  text "1" at 2363.45,3067.68 h60
  text "Top Layer" at 2773.36,3067.68 h60
  text "1.38mil" at 4562.87,3067.68 h60
  text "Dielectric 2" at 2773.36,2947.68 h60
  text "PP-006" at 3703.11,2947.68 h60
  text "8.28mil" at 4562.87,2947.68 h60
  text "4.1" at 5212.71,2947.68 h60
  text "2" at 2363.45,2827.68 h60
  text "Layer 1" at 2773.36,2827.68 h60
  text "CF-004" at 3703.11,2827.68 h60
  text "0.60mil" at 4562.87,2827.68 h60
  text "Dielectric 1" at 2773.36,2707.68 h60
  text "FR-4" at 3703.11,2707.68 h60
  text "41.93mil" at 4562.87,2707.68 h60
  text "4.8" at 5212.71,2707.68 h60
  text "3" at 2363.45,2587.68 h60
  text "Layer 2" at 2773.36,2587.68 h60
  text "CF-004" at 3703.11,2587.68 h60
  text "0.60mil" at 4562.87,2587.68 h60
  text "Dielectric 3" at 2773.36,2467.68 h60
  text "PP-006" at 3703.11,2467.68 h60
  text "8.28mil" at 4562.87,2467.68 h60
  text "4.1" at 5212.71,2467.68 h60
  text "4" at 2363.45,2347.68 h60
  text "Bottom Layer" at 2773.36,2347.68 h60
  text "1.38mil" at 4562.87,2347.68 h60
  text "Bottom Solder" at 2773.36,2227.68 h60
  text "Solder Resist" at 3703.11,2227.68 h60
  text "0.40mil" at 4562.87,2227.68 h60
  text "3.5" at 5212.71,2227.68 h60
  text "Bottom Overlay" at 2773.36,2107.68 h60
  text "Total board thickness:" at 2363.45,1987.68 h60
  text "63.25mil" at 4562.87,1987.68 h60
Board_Outline:
  lines w5: 885.83,1968.5 885.83,984.25 1771.65,984.25
  lines w10: 0,0 1771.65,0 1771.65,1968.5 0,1968.5 0,0
Drill Drawing:
  circle w10: c2363.5,1104.95 r33.33
  circle w10: c2363.5,654.95 r20
  circle w10: c2363.5,654.95 r33.33
  lines w10: 2330.17,471.62 2363.5,488.29 2396.83,471.62 2380.17,504.95 2396.83,538.29 2363.5,521.62 2330.17,538.29 2346.83,504.95 2330.17,471.62 ; 2330.17,804.95 2363.5,771.62 2396.83,804.95 2363.5,838.29 2330.17,804.95 ; 2330.17,921.62 2396.83,921.62 2396.83,988.29 2330.17,988.29 2330.17,921.62 ; 2330.17,1238.29 2346.83,1238.29 2346.83,1221.62 2380.17,1221.62 2380.17,1238.29 2396.83,1238.29 2396.83,1271.62 2380.17,1271.62 2380.17,1288.29 2346.83,1288.29 2346.83,1271.62 2330.17,1271.62 2330.17,1238.29 ; 2330.17,1371.62 2330.17,1388.29 2346.83,1404.95 2330.17,1421.62 2330.17,1438.29 2346.83,1438.29 2363.5,1421.62 2380.17,1438.29 2396.83,1438.29 2396.83,1421.62 2380.17,1404.95 2396.83,1388.29 2396.83,1371.62 2380.17,1371.62 2363.5,1388.29 2346.83,1371.62 2330.17,1371.62 ; 2330.17,1521.62 2396.83,1521.62 2396.83,1588.29 2330.17,1588.29 2330.17,1521.62 ; 2343.5,934.95 2383.5,934.95 2383.5,974.95 2343.5,974.95 2343.5,934.95
  lines w15: 2270.37,426.62 16928.19,426.62 ; 2270.37,1626.62 16928.19,1626.62 ; 2821.25,276.62 2821.25,1776.62 ; 3421.09,276.62 3421.09,1776.62 ; 4550.76,276.62 4550.76,1776.62 ; 5056.64,276.62 5056.64,1776.62 ; 5790.44,276.62 5790.44,1776.62 ; 7289.99,276.62 7289.99,1776.62 ; 7879.84,276.62 7879.84,1776.62 ; 8625.64,276.62 8625.64,1776.62 ; 10914.93,276.62 10914.93,1776.62 ; 11768.69,276.62 11768.69,1776.62 ; 13102.3,276.62 13102.3,1776.62 ; 14435.91,276.62 14435.91,1776.62 ; 15525.59,276.62 15525.59,1776.62 ; 2270.37,276.62 16928.19,276.62 16928.19,1776.62 2270.37,1776.62 2270.37,276.62
  text "Symbol" at 2360.37,1671.62 h72
  text "Count" at 2866.25,1671.62 h72
  text "Hole Size" at 3466.09,1671.62 h72
  text "Plated" at 4595.76,1671.62 h72
  text "Hole Type" at 5101.64,1671.62 h72
  text "Drill Layer Pair" at 5835.44,1671.62 h72
  text "Via/Pad" at 7334.99,1671.62 h72
  text "Pad Shape" at 7924.84,1671.62 h72
  text "Template" at 8670.64,1671.62 h72
  text "Description" at 10959.93,1671.62 h72
  text "Hole Tolerance (+)" at 11813.69,1671.62 h72
  text "Hole Tolerance (-)" at 13147.3,1671.62 h72
  text "Hole Length" at 14480.91,1671.62 h72
  text "Routed Path Length" at 15570.59,1671.62 h72
  text "2" at 2866.25,1521.62 h60
  text "27.56mil (0.700mm)" at 3466.09,1521.62 h60
  text "NPTH" at 4595.76,1521.62 h60
  text "Round" at 5101.64,1521.62 h60
  text "Top Layer - Bottom Layer" at 5835.44,1521.62 h60
  text "Pad" at 7334.99,1521.62 h60
  text "Rounded" at 7924.84,1521.62 h60
  text "c0hn70p0" at 8670.64,1521.62 h60
  text "-" at 14480.91,1521.62 h60
  text "-" at 15570.59,1521.62 h60
  text "2" at 2866.25,1371.62 h60
  text "92.91mil (2.360mm)" at 3466.09,1371.62 h60
  text "NPTH" at 4595.76,1371.62 h60
  text "Round" at 5101.64,1371.62 h60
  text "Top Layer - Bottom Layer" at 5835.44,1371.62 h60
  text "Pad" at 7334.99,1371.62 h60
  text "Rounded" at 7924.84,1371.62 h60
  text "c0hn236" at 8670.64,1371.62 h60
  text "-" at 14480.91,1371.62 h60
  text "-" at 15570.59,1371.62 h60
  text "2" at 2866.25,1221.62 h60
  text "110.63mil (2.810mm)" at 3466.09,1221.62 h60
  text "NPTH" at 4595.76,1221.62 h60
  text "Round" at 5101.64,1221.62 h60
  text "Top Layer - Bottom Layer" at 5835.44,1221.62 h60
  text "Pad" at 7334.99,1221.62 h60
  text "Rounded" at 7924.84,1221.62 h60
  text "c0hn281" at 8670.64,1221.62 h60
  text "-" at 14480.91,1221.62 h60
  text "-" at 15570.59,1221.62 h60
  text "4" at 2866.25,1071.62 h60
  text "25.59mil (0.650mm)" at 3466.09,1071.62 h60
  text "PTH" at 4595.76,1071.62 h60
  text "Slot" at 5101.64,1071.62 h60
  text "Top Layer - Bottom Layer" at 5835.44,1071.62 h60
  text "Pad" at 7334.99,1071.62 h60
  text "Rounded" at 7924.84,1071.62 h60
  text "r150_100h65_120r100m155_105mx155_105p0" at 8670.64,1071.62 h60
  text "47.24mil (1.200mm)" at 14480.91,1071.62 h60
  text "21.65mil (0.550mm)" at 15570.59,1071.62 h60
  text "4" at 2866.25,921.62 h60
  text "59.06mil (1.500mm)" at 3466.09,921.62 h60
  text "PTH" at 4595.76,921.62 h60
  text "Slot" at 5101.64,921.62 h60
  text "Top Layer - Bottom Layer" at 5835.44,921.62 h60
  text "Pad" at 7334.99,921.62 h60
  text "(Mixed)" at 7924.84,921.62 h60
  text "(Mixed)" at 8670.64,921.62 h60
  text "62.01mil (1.575mm)" at 14480.91,921.62 h60
  text "2.95mil (0.075mm)" at 15570.59,921.62 h60
  text "6" at 2866.25,771.62 h60
  text "51.18mil (1.300mm)" at 3466.09,771.62 h60
  text "PTH" at 4595.76,771.62 h60
  text "Round" at 5101.64,771.62 h60
  text "Top Layer - Bottom Layer" at 5835.44,771.62 h60
  text "Pad" at 7334.99,771.62 h60
  text "Rounded" at 7924.84,771.62 h60
  text "c220h130" at 8670.64,771.62 h60
  text "-" at 14480.91,771.62 h60
  text "-" at 15570.59,771.62 h60
  text "20" at 2866.25,621.62 h60
  text "40.55mil (1.030mm)" at 3466.09,621.62 h60
  text "PTH" at 4595.76,621.62 h60
  text "Round" at 5101.64,621.62 h60
  text "Top Layer - Bottom Layer" at 5835.44,621.62 h60
  text "Pad" at 7334.99,621.62 h60
  text "(Mixed)" at 7924.84,621.62 h60
  text "(Mixed)" at 8670.64,621.62 h60
  text "-" at 14480.91,621.62 h60
  text "-" at 15570.59,621.62 h60
  text "190" at 2866.25,471.62 h60
  text "11.81mil (0.300mm)" at 3466.09,471.62 h60
  text "PTH" at 4595.76,471.62 h60
  text "Round" at 5101.64,471.62 h60
  text "Top Layer - Bottom Layer" at 5835.44,471.62 h60
  text "(Mixed)" at 7334.99,471.62 h60
  text "Rounded" at 7924.84,471.62 h60
  text "(Mixed)" at 8670.64,471.62 h60
  text "-" at 14480.91,471.62 h60
  text "-" at 15570.59,471.62 h60
  text "230 Total" at 2866.25,321.62 h60
  text "Slot definitions :" at 2360.37,176.64 h60
  text "Routed Path Length" at 3393.06,176.64 h60
  text "= Calculated from tool start centre position to tool end centre position." at 4495.73,176.64 h60
  text "Hole Length" at 3393.06,76.67 h60
  text "= Routed Path Length + Tool Size = Slot length as defined in the PCB layout" at 4085.86,76.67 h60

## Dimensions
1771.65,1968.5 to 1771.65,0 on Mechanical 1
0,1968.5 to 1771.65,1968.5 on Mechanical 1

## Text inside footprints (layer, text, board x,y; h text height)
J1: Top Overlay "A1" at 101.06,270.05 h27.56 r90
J3: Top Overlay "PCB Edge" at 1017.69,1940.01 h39.37 r180